# Altium PCB WSN_Enviroment Monitoring system.PcbDoc (part 1 of 2)
Units mil, origin at the board's own origin, x right, y up, seen from the top; angles counter-clockwise.
Board outline 1950 x 3410 mil, 2 copper layers (Top Layer, Bottom Layer); 31 components, 32 nets, 211 pads, 40 vias.
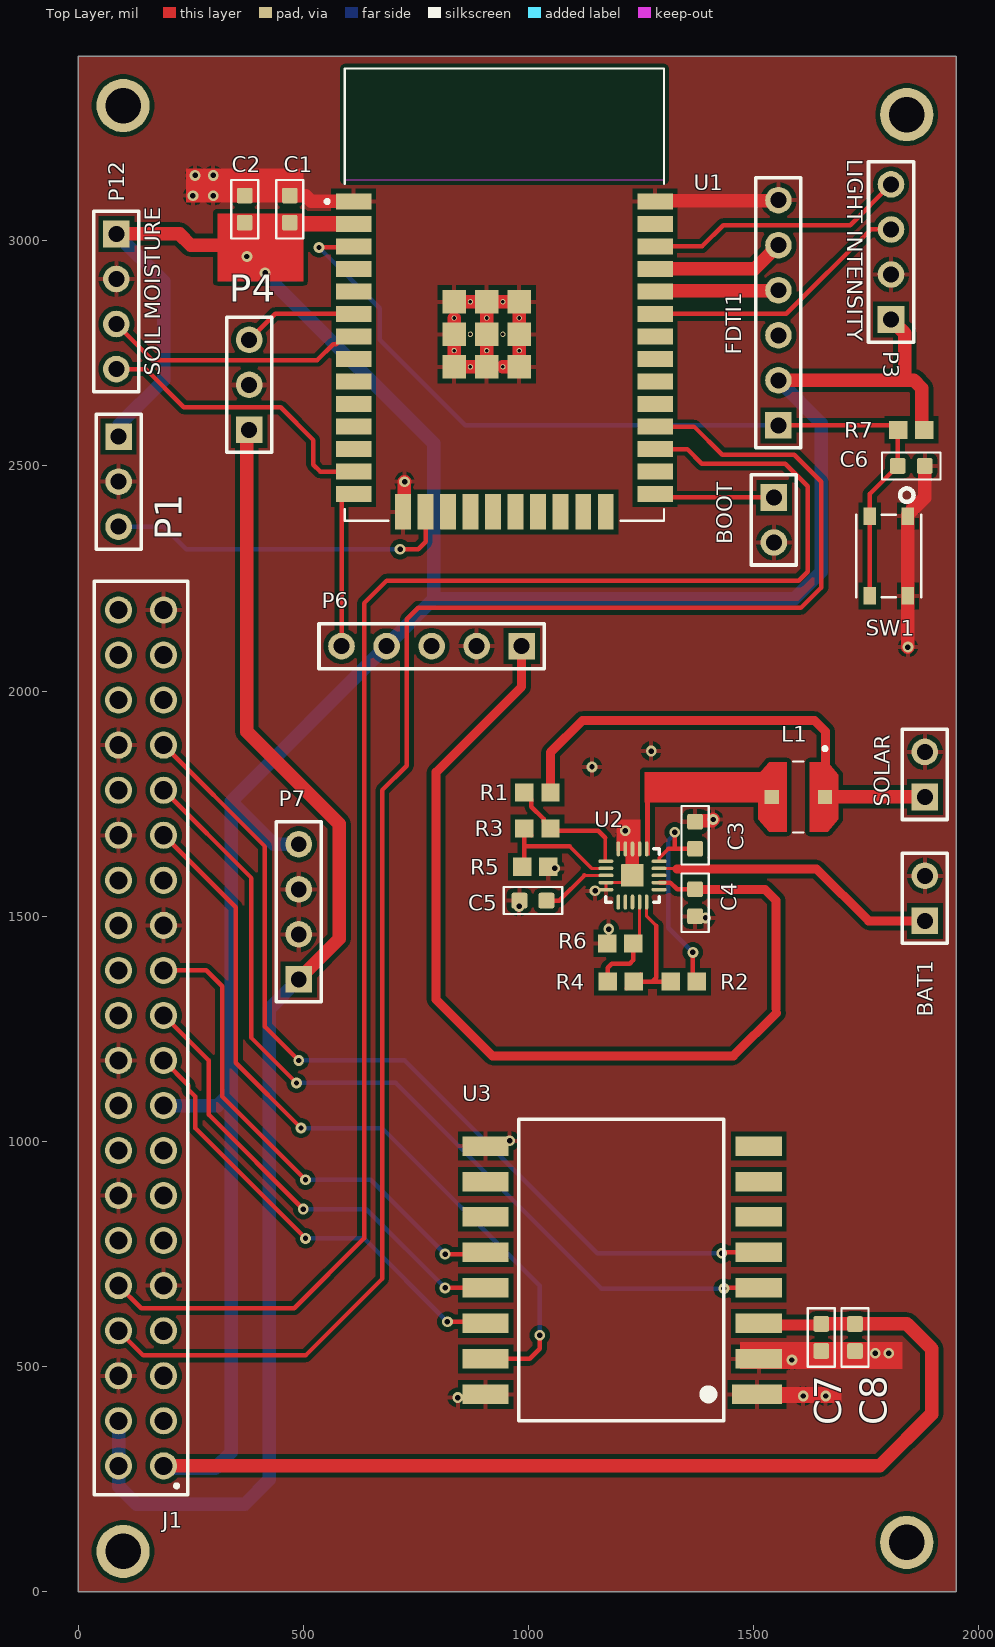
[diagram p0: Top Layer view]
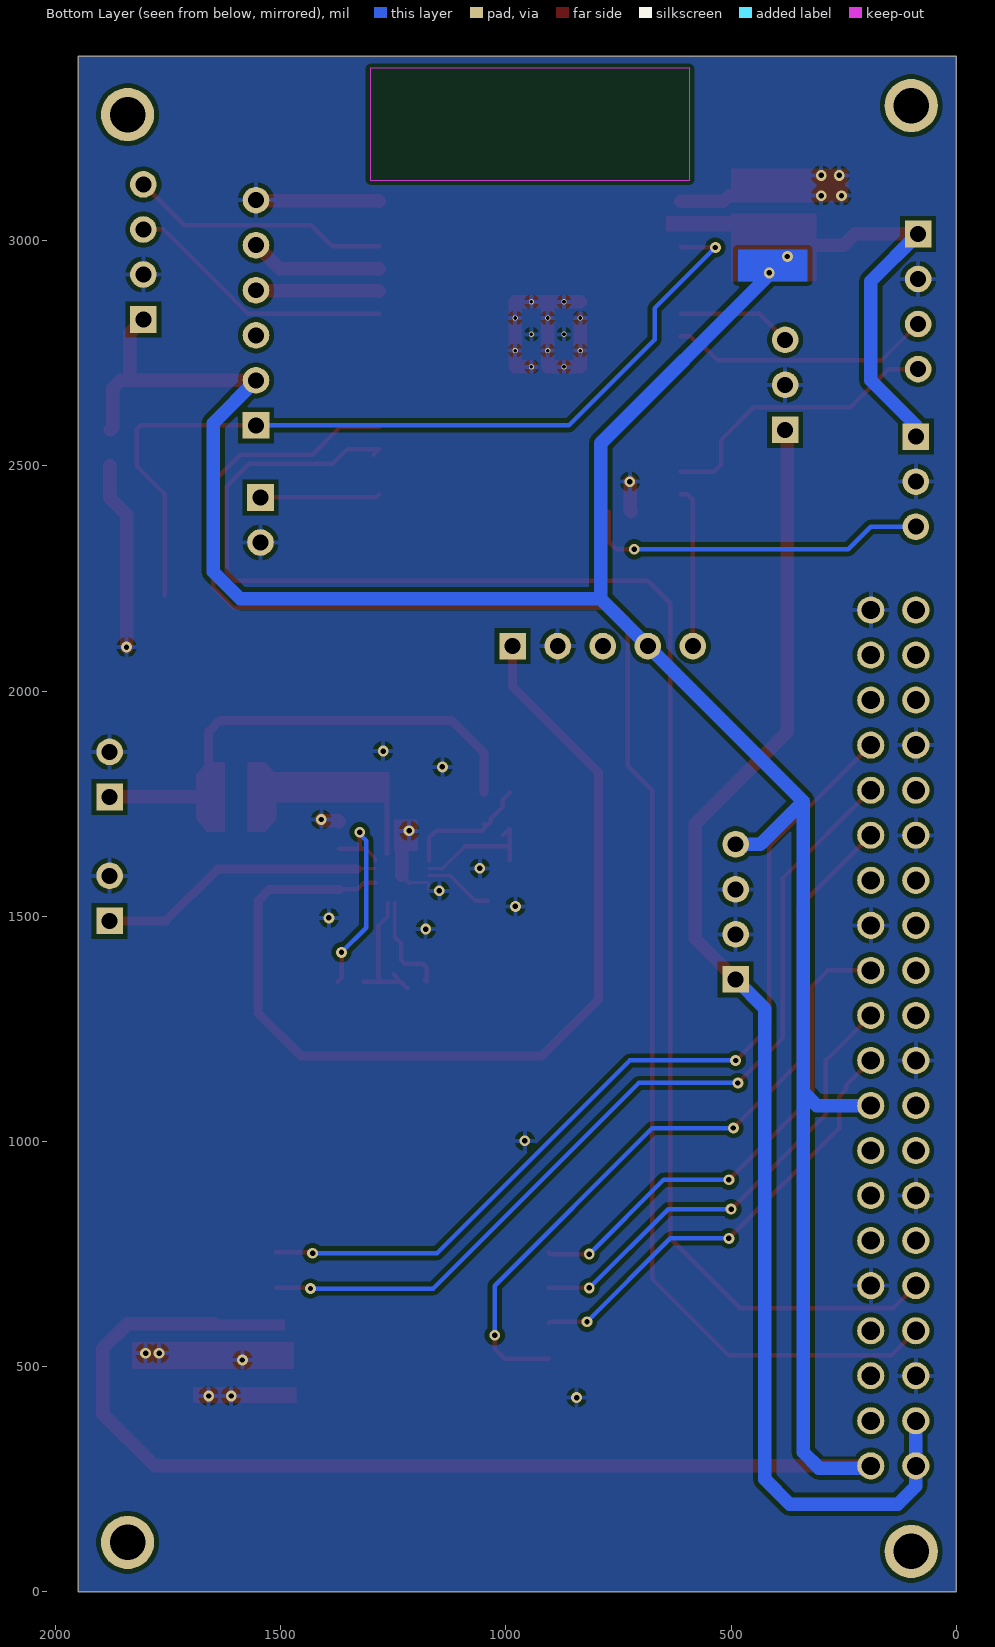
[diagram p1: Bottom Layer view, seen from below]
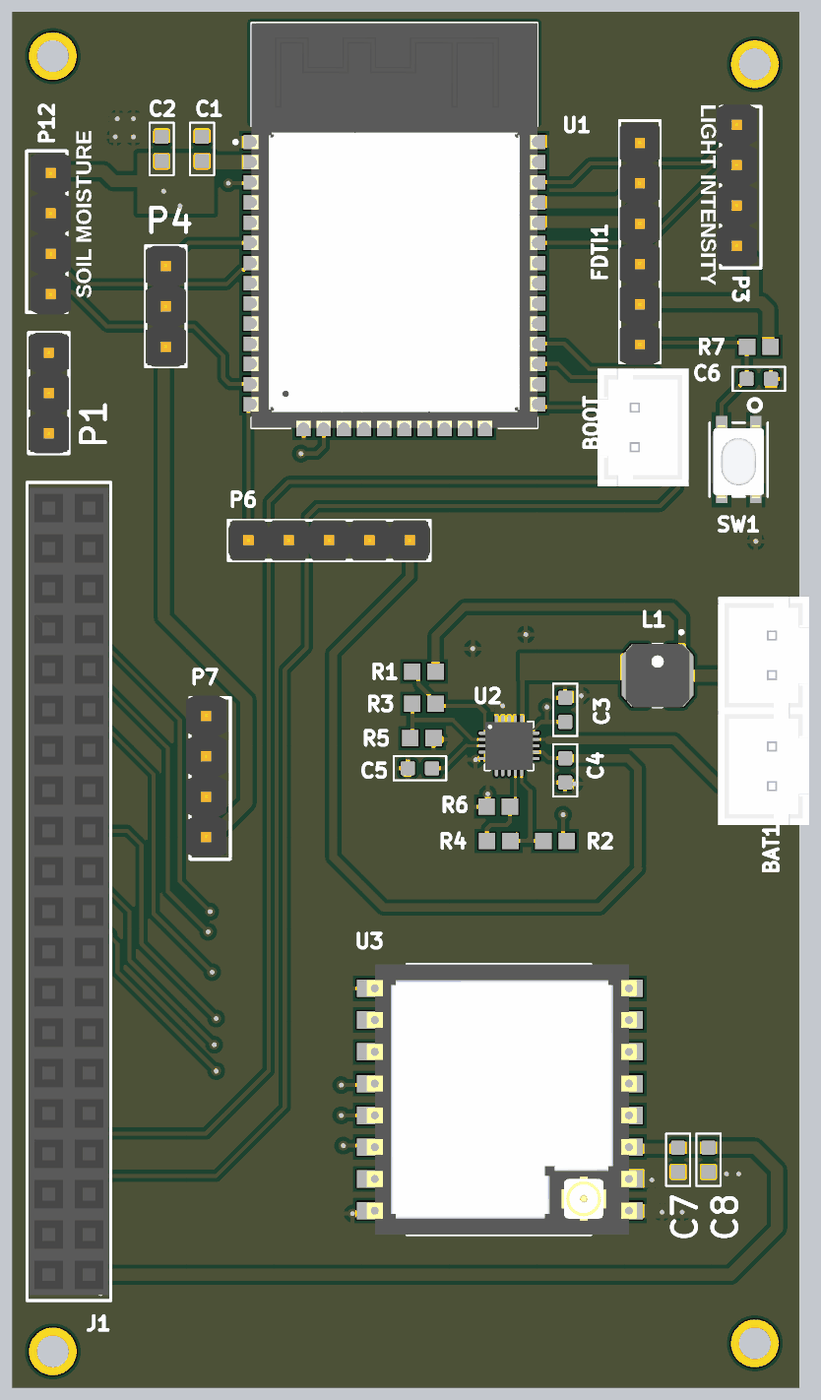
[diagram p2: 3D render of the assembled board from above, using the file's embedded part models]

## Layer stack, top to bottom
Top Solder: solder mask 0.4, Solder Resist, Dk 3.5
Top Layer: signal copper 1.4
Dielectric 1: dielectric 12.6, FR-4, Dk 4.8
Bottom Layer: signal copper 1.4
Bottom Solder: solder mask 0.4, Solder Resist, Dk 3.5

## Board outline
0,0 0,3410 1950,3410 1950,0

## Design rules (kind name [scope] priority, off if disabled: settings)
Clearance U2 [HasFootprint('QFN40P300X300X100-21N')] p1: gap=6 ignorepadtopadclearanceinfootprint=FALSE
Clearance [All] p2: gap=10 ignorepadtopadclearanceinfootprint=FALSE except(0: Arc-Hole Track-Hole SMDPad-Hole THPad-Hole Via-Hole Fill-Hole Poly-Hole Region-Hole Text-Hole; 7: Arc-Arc Arc-Track Track-Track)
MinimumSolderMaskSliver [All] p1: minsoldermaskwidth=4
PolygonConnect [All] p1: connectstyle=Relief reliefconductorwidth=10 reliefentries=4 polygonreliefangle="90 Angle" airgapwidth=10
RoutingVias [All] p1: holewidth=28 width=50 viastyle="Through Hole" minholewidth=28 minwidth=50 maxholewidth=28 maxwidth=50
SilkToSolderMaskClearance [IsPad] p1: minsilkscreentomaskgap=4 clearancetoexposedcopper=TRUE
SolderMaskExpansion [All] p1: expansion=4 istentingtop=FALSE
Width [All] p1: maxlimit=100 minlimit=7 preferedwidth=20
28 further rules are at their usual default settings.

## Classes and differential pairs
component class "TOP LEVEL": BAT1
component class MID12: P7
component class MID11: C3 C4 C5 L1 R1 R2 R3 R4 R5 R6 SOLAR U2
component class MID7: P6
component class MID2: BOOT C1 C2 C6 FDTI1 P1 P3 P4 P12 R7 SW1 U1
component class MID1: C7 C8 J1 U3

## Components (designator, comment, footprint, x,y, rotation, side; value= is the part's Value field where it differs from the comment)
BAT1 "Header 2" HDR1X2 1880,1490 r90 top
BOOT "Header 2" HDR1X2 1545,2430 r270 top
C1 "0.1uF" C0603 470,3070 r180 top
C2 "10uF" C0603 370,3070 r0 top
C3 "100uF" C0603 1370,1680 r180 top
C4 "0.1uF" C0603 1370,1530 r0 top
C5 "0.1uF" C0603 1010,1535 r270 top
C6 "0.1uF" C0603 1850,2500 r90 top
C7 "0.1uF" C0603 1650,565 r0 top
C8 "10uF" C0603 1725,565 r180 top
FDTI1 "Header 6" HDR1X6 1555,2590 r90 top
J1 "PRT-14017" 61304021821 140,1230 r90 top
L1 "22uH" IND_VLCF4020T-220MR56 1599.06,1765 r270 top
P1 "TEMP & HUMIDITY" HDR1X3 90,2565 r270 top
P3 "LIGHT INTENSITY" HDR1X4 1805,2825 r90 top
P4 "AIR QUALITY" HDR1X3 380,2580 r90 top
P6 "Header 5" HDR1X5 985,2100 r180 top
P7 "Header 4" HDR1X4 490,1360 r90 top
P12 "SOIL MOISTURE" HDR1X4 85,3015 r270 top
R1 "0R" RESC1607X60N 1020,1775 r0 top
R2 "6.2M" RESC1607X60N 1345,1355 r0 top
R3 "3M" RESC1607X60N 1020,1695 r0 top
R4 "1M" RESC1607X60N 1205,1355 r0 top
R5 "9.1M" RESC1607X60N 1015,1610 r180 top
R6 "3M" RESC1607X60N 1203.94,1440 r0 top
R7 "RC0603FR-0710KL" RESC1607X60N 1850,2580 r0 top
SOLAR "Header 2" HDR1X2 1880,1765 r90 top
SW1 "PTS815 SJM 250 SMTR LFS" "SW4_PTS815 SJM 250 SMTR LFS_CNK" 1800,2300 r270 top
U1 "ESP32-WROOM-32D" MODULE_ESP32-WROOM-32D 946.61,2880.43 r0 top
U2 "SPV1050TTR" QFN40P300X300X100-21N 1230.94,1590.75 r0 top
U3 "RA-02" RA-02 1208.15,714.37 r180 top

## Footprints (in the part's own frame and the unit in brackets; to place one, negate y for a bottom-side part, rotate by r counter-clockwise, add the part's x,y. Pads: shape width x height; smd on the part's side, far side on the other; paste and mask are expansions set on the pad)
61304021821 [mm]
  round 1.53 hole 1.02: 1(-24.13,-1.27) 2(-24.13,1.27) 3(-21.59,-1.27) 4(-21.59,1.27) 5(-19.05,-1.27) 6(-19.05,1.27) 7(-16.51,-1.27) 8(-16.51,1.27) 9(-13.97,-1.27) 10(-13.97,1.27) 11(-11.43,-1.27) 12(-11.43,1.27) 13(-8.89,-1.27) 14(-8.89,1.27) 15(-6.35,-1.27) 16(-6.35,1.27) 17(-3.81,-1.27) 18(-3.81,1.27) 19(-1.27,-1.27) 20(-1.27,1.27) 21(1.27,-1.27) 22(1.27,1.27) 23(3.81,-1.27) 24(3.81,1.27) 25(6.35,-1.27) 26(6.35,1.27) 27(8.89,-1.27) 28(8.89,1.27) 29(11.43,-1.27) 30(11.43,1.27) 31(13.97,-1.27) 32(13.97,1.27) 33(16.51,-1.27) 34(16.51,1.27) 35(19.05,-1.27) 36(19.05,1.27) 37(21.59,-1.27) 38(21.59,1.27) 39(24.13,-1.27) 40(24.13,1.27)
  silkscreen extent -25.75,-2.64 25.75,2.64, body extent -25.4,-2.5 25.4,2.5, height 13.75
C0603 [mil]
  rrect25% 35x35 smd: 1(0,30) 2(0,-30)
  silkscreen extent -30,-65 30,65
HDR1X2 [mm] "Connector; Header; 2 Position"
  rect 1.5x1.5 hole 0.9: 1(0,0)
  round 1.5 hole 0.9: 2(2.54,0)
  silkscreen extent -1.27,-1.27 3.81,1.27, body extent -2.43,-2.41 4.97,3.34, height 7.25
HDR1X3 [mm] "Connector; Header; 3 Position"
  rect 1.5x1.5 hole 0.9: 1(0,0)
  round 1.5 hole 0.9: 2(2.54,0) 3(5.08,0)
  silkscreen extent -1.27,-1.27 6.35,1.27, body extent -1.27,-1.27 6.35,1.27, height 8.67
HDR1X4 [mm] "Connector; Header; 4 Position"
  rect 1.5x1.5 hole 0.9: 1(0,0)
  round 1.5 hole 0.9: 2(2.54,0) 3(5.08,0) 4(7.62,0)
  silkscreen extent -1.27,-1.27 8.89,1.27, body extent -1.14,-1.02 9.02,1.52, height 8.67
HDR1X5 [mm] "Connector; Header; 5 Position"
  rect 1.5x1.5 hole 0.9: 1(0,0)
  round 1.5 hole 0.9: 2(2.54,0) 3(5.08,0) 4(7.62,0) 5(10.16,0)
  silkscreen extent -1.27,-1.27 11.43,1.27, body extent -1.27,-1.27 11.43,1.27, height 8.67
HDR1X6 [mm] "Connector; Header; 6 Position"
  rect 1.5x1.5 hole 0.9: 1(0,0)
  round 1.5 hole 0.9: 2(2.54,0) 3(5.08,0) 4(7.62,0) 5(10.16,0) 6(12.7,0)
  silkscreen extent -1.27,-1.27 13.97,1.27, body extent -1.4,-1.27 13.84,1.27, height 8.67
IND_VLCF4020T-220MR56 [mm]
  rect 0.8x0.8 smd paste-1 mask+0: 1(0,1.5) 2(0,-1.5)
  Top Layer region: 1.95,1.65 1.95,0.65 -1.95,0.65 -1.95,1.65 -1.25,2.25 1.25,2.25
  Top Layer region: 1.95,-1.65 1.25,-2.25 -1.25,-2.25 -1.95,-1.65 -1.95,-0.65 1.95,-0.65
  silkscreen extent -2.82,-0.3 2,1.6, body extent -2,-2 2,2, height 2
MODULE_ESP32-WROOM-32D [mm]
  rect 2x0.9 smd: 1(-8.5,5.26) 2(-8.5,3.99) 3(-8.5,2.72) 4(-8.5,1.45) 5(-8.5,0.18) 6(-8.5,-1.09) 7(-8.5,-2.36) 8(-8.5,-3.63) 9(-8.5,-4.9) 10(-8.5,-6.17) 11(-8.5,-7.44) 12(-8.5,-8.71) 13(-8.5,-9.98) 14(-8.5,-11.25) 25(8.5,-11.25) 26(8.5,-9.98) 27(8.5,-8.71) 28(8.5,-7.44) 29(8.5,-6.17) 30(8.5,-4.9) 31(8.5,-3.63) 32(8.5,-2.36) 33(8.5,-1.09) 34(8.5,0.18) 35(8.5,1.45) 36(8.5,2.72) 37(8.5,3.99) 38(8.5,5.26)
  rect 0.9x2 smd: 15(-5.715,-12.25) 16(-4.445,-12.25) 17(-3.175,-12.25) 18(-1.905,-12.25) 19(-0.635,-12.25) 20(0.635,-12.25) 21(1.905,-12.25) 22(3.175,-12.25) 23(4.445,-12.25) 24(5.715,-12.25)
  rect 1.33x1.33 smd: 39_1(-2.835,-0.405) 39_2(-1,-0.405) 39_3(0.835,-0.405) 39_4(-2.835,-2.24) 39_5(-1,-2.24) 39_6(0.835,-2.24) 39_7(-2.835,-4.075) 39_8(-1,-4.075) 39_9(0.835,-4.075)
  round 0.3 hole 0.2: 39_10(-1.917,-0.405) 39_11(-0.082,-0.405) 39_12(-2.835,-1.322) 39_13(-1,-1.322) 39_14(0.835,-1.322) 39_15(-1.917,-2.24) 39_16(-0.082,-2.24) 39_17(-2.835,-3.157) 39_18(-1,-3.157) 39_19(0.835,-3.157) 39_20(-1.917,-4.075) 39_21(-0.082,-4.075)
  Keep-Out Layer region: 9,6.45 -9,6.45 -9,12.75 9,12.75
  silkscreen extent -10.1,-12.75 9,12.75, body extent -9,-12.75 9,12.75, height 3.25
QFN40P300X300X100-21N [mm]
  oval 0.85x0.2 smd: 1(-1.5,0.8) 2(-1.5,0.4) 3(-1.5,0) 4(-1.5,-0.4) 5(-1.5,-0.8) 11(1.5,-0.8) 12(1.5,-0.4) 13(1.5,0) 14(1.5,0.4) 15(1.5,0.8)
  oval 0.2x0.85 smd: 6(-0.8,-1.5) 7(-0.4,-1.5) 8(0,-1.5) 9(0.4,-1.5) 10(0.8,-1.5) 16(0.8,1.5) 17(0.4,1.5) 18(0,1.5) 19(-0.4,1.5) 20(-0.8,1.5)
  rrect4% 1.27x1.27 smd paste-2: 21(0,0)
  silkscreen extent -1.5,-1.5 1.5,1.5, body extent -1.5,-1.5 1.5,1.5, height 1
RA-02 [mm]
  rect 2.8x1.1 smd: 1(-7.6,7)
  rect 2.6x1.1 smd: 2(-7.7,5) 3(-7.7,3) 4(-7.7,1) 5(-7.7,-1) 6(-7.7,-3) 7(-7.7,-5) 8(-7.7,-7) 9(7.7,-7) 10(7.7,-5) 11(7.7,-3) 12(7.7,-1) 13(7.7,1) 14(7.7,3) 15(7.7,5) 16(7.7,7)
  silkscreen extent -5.72,-8.5 5.84,8.5, body extent -8.63,-8.5 8.37,8.5, height 3.3
RESC1607X60N [mm]
  rect 1.04x1.02 smd: 1(-0.735,0) 2(0.735,0)
"SW4_PTS815 SJM 250 SMTR LFS_CNK" [mil]
  rect 39x28 smd paste+0 mask+0: 1(-88.58,42.32) 2(88.58,42.32) 3(-88.58,-42.32) 4(88.58,-42.32)
  silkscreen extent -150,-72 92,72, body extent -86,-63 96,63, height 106

## Part data
BAT1: "CONN HEADER EH TOP 2POS 2.5MM", Color=Natural, Housing Color=White, Manufacturer=JST, Manufacturer Part Number=B2B-EH-A, Package Quantity=1000, Supplier Part Number 1=455-B2B-EH-A-ND, Category=Connectors, ComponentLink1Description=https://media.digikey.com/pdf/Data%20Sheets/JST%20PDFs/EH%20Series.pdf?src-supplier=Digikey, ComponentLink1URL=https://media.digikey.com/pdf/Data%20Sheets/JST%20PDFs/EH%20Series.pdf?src-supplier=Digikey, Contact Material=Brass, Contact Mating Length=0.13inch, Contact Plating=Tin,Lead, Contact Type="Male Pin", Fastening Type=Detent, Gender=Male, Housing Material=Nylon, LatestRevisionDate=17-Jul-2002, LatestRevisionNote="Re-released for DXP Platform.", Lead Free="Contains Lead", Mount="Through Hole", Number of Contacts=2, Number of Positions=2, Number of Rows=1, Packaging=Bulk, Pitch=0.098inch, Pricing 1="1=0.13, 10=0.099, 100=0.0756, 500=0.06274, 1000=0.05803, 5000=0.04865, 10000=0.04521 (USD)", Publisher="Altium Limited", RoHS=Yes, Series=EH, Stock 1=251874, Supplier 1=Digikey, Termination=Press-Fit
BOOT: "THT Vertical Pin Header WR-PHD, Pitch 2.54 mm, Single Row, 2 pins", Color=Black, Contact Resistance=20mR, Current Rating=3A, Manufacturer="Wurth Electronics", Manufacturer Part Number=61300211121, Max Operating Temperature=125°C, Min Operating Temperature=-40°C, Operating Supply Voltage=250V, Supplier Part Number 1=732-5315-ND, Category="Headers and Wire Housings", ComponentLink1Description=https://datasheet.ciiva.com/13619/6130xx11121-48870-13619345.pdf?src-supplier=Mouser, ComponentLink1URL=https://datasheet.ciiva.com/13619/6130xx11121-48870-13619345.pdf?src-supplier=Mouser, Contact Gender=Male, Contact Material="Copper Alloy,Copper", Contact Mating Length=0.236inch, Contact Plating=Gold, Contact Type="Male Pin", Gender=29Gender, Height=8.94mm, Housing Material=PBT, LatestRevisionDate=17-Jul-2002, LatestRevisionNote="Re-released for DXP Platform.", Lead Free=5697LeadFree, Mount="Through Hole", Number of Contacts=2, Number of Positions=2, Number of Rows=1, Orientation=5495OrientationType, Packaging=Bulk, Pitch=0.1inch, Pricing 1="1=0.13, 10=0.113, 25=0.094, 50=0.079, 100=0.071, 1000=0.065 (USD)", Publisher="Altium Limited", Reach SVHC Compliant=Unknown, RoHS=Yes, RoHS Compliant=Yes, Series=WR-PHD, Stock 1=83516, Supplier 1=Digikey, Termination="Through Hole", Voltage Rating=250V
C1 C6: library part C0603C104J4RACTU, "Capacitor; Ceramic; Cap; .100uF; Tol+5%; SMT; Vol-Rtg 16V; X7R; TR", Capacitance=100nF, Case Code (Imperial)=0603, Case Code (Metric)=1608, Dielectric=X7R, Dielectric Material=4241ConductorMaterial, Manufacturer=KEMET, Max Operating Temperature=125°C, Min Operating Temperature=-55°C, Package="0603 Kemet", Package Quantity=4000, Supplier Part Number 1=399-C0603C104J4RACTUCT-ND, Temperature Coefficient=30ppm/°C, Tolerance=5%, Voltage=16V, Availability=Unavailable, Case/Package=0603, Category="Ceramic Capacitors", ComponentLink1Description=https://datasheet.ciiva.com/5999/1732731-5999390.pdf?src-supplier=Farnell, ComponentLink1URL=https://datasheet.ciiva.com/5999/1732731-5999390.pdf?src-supplier=Farnell, ComponentLink2Description=https://datasheet.ciiva.com/28645/1851736-28645613.pdf?src-supplier=Element14, ComponentLink2URL=https://datasheet.ciiva.com/28645/1851736-28645613.pdf?src-supplier=Element14, ComponentLink3Description=https://datasheet.ciiva.com/7823/kem-c1002-x7r-smd-7823982.pdf?src-supplier=Element14, ComponentLink3URL=https://datasheet.ciiva.com/7823/kem-c1002-x7r-smd-7823982.pdf?src-supplier=Element14, Construction=Flat, Depth=0.8mm, Dissipation Factor=3.5%, Height=0.8mm, Lead Free=5697LeadFree, Lead Pitch=0.7mm, Length=1.6mm, Manufacturer Part Number=C0603C104J4RACTU, Material=4241ConductorMaterial, MF=KEMET, Mount="Surface Mount", MP=C0603C104J4RACTU, Number of Pins=2, Packaging="Tape and Reel", Price=None, Pricing 1="1=0.12, 10=0.065, 50=0.0452, 100=0.0391, 500=0.02854, 1000=0.02527 (USD)", Radiation Hardening=No, Reach SVHC Compliant=No, RoHS=Yes, RoHS Compliant=Yes, Series="SMD Comm X7R", SnapEDA_Link=https://www.snapeda.com/parts/C0603C104J4RACTU/KEMET/view-part/550758/?ref=snap, Stock 1=206335, Supplier 1=Digikey, Termination=SMD/SMT, Voltage Rating=16V, Voltage Rating (DC)=16V, Width=0.8mm
C2: library part CERAMIC-10UF-10V-10%-X5R(0603), "Multilayer Ceramic Capacitors MLCC - SMD/SMT 16V 10uF X5R 0603 10%", Case/Package=345Case, Dielectric=1537DielectricType, Manufacturer="Kyocera AVX", Manufacturer Part Number=0603YD106KAT2A, Max Operating Temperature=85°C, Min Operating Temperature=-55°C, Package=None, Supplier Part Number 1=478-KGM15CR51C106KTCT-ND, Tolerance=10%, Voltage Rating=16V, Availability=Unavailable, Capacitance=10uF, Category="Ceramic Capacitors", Height=940um, Material=4241ConductorMaterial, MP=CERAMIC-10UF-10V-10%-X5R(0603), Price=None, Pricing 1="1=0.37, 10=0.216, 50=0.1554, 100=0.1367, 500=0.10482, 1000=0.09488 (USD)", RoHS=Yes, Stock 1=6982, Supplier 1=Digikey, Voltage Rating (DC)=16V
C3: library part C0603C104J4RACTU, "Cap Tant Solid 100uF 4V M CASE 20% 1810-09 T/R", Case Code (Imperial)=0603, Case Code (Metric)=1608, Manufacturer="Vishay Sprague", Manufacturer Part Number=298W107X0004M2T, Max Operating Temperature=125°C, Min Operating Temperature=-55°C, Supplier Part Number 1=718-2216-1-ND, Tolerance=20%, Voltage Rating=4V, Availability=Unavailable, Capacitance=100uF, Case/Package=0603, Category="Tantalum Capacitors", ComponentLink1Description=http://www.vishay.com/docs/40169/typperfchar298dwtrl8.pdf?src-supplier=Digikey, ComponentLink1URL=http://www.vishay.com/docs/40169/typperfchar298dwtrl8.pdf?src-supplier=Digikey, ComponentLink2Description=http://www.vishay.com/docs/40065/298d298w.pdf?src-supplier=Digikey, ComponentLink2URL=http://www.vishay.com/docs/40065/298d298w.pdf?src-supplier=Digikey, Features="General Purpose", MF="Vishay Sprague", Mount="Surface Mount", MP=298W107X0004M2T, Package=0603, Packaging="Cut Tape", Price=None, Pricing 1="1=1.93, 10=1.23, 50=0.9484, 100=0.8606, 500=0.71056, 1000=0.66366 (USD)", RoHS=Yes, RoHS Compliant=Yes, Series="MICROTAN®, 298W", Stock 1=3940, Supplier 1=Digikey
C4 C5: library part C0603C104J4RACTU, "Capacitor; Ceramic; Cap; .100uF; Tol+5%; SMT; Vol-Rtg 16V; X7R; TR", Capacitance=100nF, Case Code (Imperial)=0603, Case Code (Metric)=1608, Dielectric=X7R, Dielectric Material=4241ConductorMaterial, Manufacturer=KEMET, Max Operating Temperature=125°C, Min Operating Temperature=-55°C, Package="0603 Kemet", Package Quantity=4000, Supplier Part Number 1=80-C0603C104J4R, Temperature Coefficient=30ppm/°C, Tolerance=5%, Voltage=16V, Availability=Unavailable, Case/Package=0603, Category="Ceramic Capacitors", ComponentLink1Description=https://datasheet.ciiva.com/5999/1732731-5999390.pdf?src-supplier=Farnell, ComponentLink1URL=https://datasheet.ciiva.com/5999/1732731-5999390.pdf?src-supplier=Farnell, ComponentLink2Description=https://datasheet.ciiva.com/28645/1851736-28645613.pdf?src-supplier=Element14, ComponentLink2URL=https://datasheet.ciiva.com/28645/1851736-28645613.pdf?src-supplier=Element14, ComponentLink3Description=https://datasheet.ciiva.com/7823/kem-c1002-x7r-smd-7823982.pdf?src-supplier=Element14, ComponentLink3URL=https://datasheet.ciiva.com/7823/kem-c1002-x7r-smd-7823982.pdf?src-supplier=Element14, Construction=Flat, Depth=0.8mm, Dissipation Factor=3.5%, Height=0.8mm, Lead Free=5697LeadFree, Lead Pitch=0.7mm, Length=1.6mm, Manufacturer Part Number=C0603C104J4RACTU, Material=4241ConductorMaterial, MF=KEMET, Mount="Surface Mount", MP=C0603C104J4RACTU, Number of Pins=2, Packaging="Tape and Reel", Price=None, Pricing 1="1=0.12, 10=0.035, 50=0.035, 100=0.018, 1000=0.013, 10000=0.006 (USD)", Radiation Hardening=No, Reach SVHC Compliant=No, RoHS=Yes, RoHS Compliant=Yes, Series="SMD Comm X7R", SnapEDA_Link=https://www.snapeda.com/parts/C0603C104J4RACTU/KEMET/view-part/550758/?ref=snap, Stock 1=240765, Supplier 1=Mouser, Termination=SMD/SMT, Voltage Rating=16V, Voltage Rating (DC)=16V, Width=0.8mm
C7: library part C0603C104J4RACTU, "0.1ÂµF Â±5% 16V Ceramic Capacitor X7R 0603 _1608 Metric_", Package="0603 Kemet", Availability=Unavailable, MF=KEMET, MP=C0603C104J4RACTU, Price=None, SnapEDA_Link=https://www.snapeda.com/parts/C0603C104J4RACTU/KEMET/view-part/550758/?ref=snap
C8: library part CERAMIC-10UF-10V-10%-X5R(0603), "302010103", Package=None, Availability=Unavailable, MP=CERAMIC-10UF-10V-10%-X5R(0603), Price=None
FDTI1: "THT Vertical Pin Header WR-PHD, Pitch 2.54 mm, Single Row, 6 pins", Color=Black, Contact Resistance=20mR, Current Rating=3A, Manufacturer="Wurth Electronics", Manufacturer Part Number=61300611121, Max Operating Temperature=125°C, Min Operating Temperature=-40°C, Operating Supply Voltage=250V, Supplier Part Number 1=732-5319-ND, Category="Headers and Wire Housings", ComponentLink1Description=http://www.mouser.com/ds/2/445/6130xx11121-538006.pdf?src-supplier=Mouser, ComponentLink1URL=http://www.mouser.com/ds/2/445/6130xx11121-538006.pdf?src-supplier=Mouser, ComponentLink2Description=http://www.farnell.com/cad/1737268.pdf?src-supplier=Element14, ComponentLink2URL=http://www.farnell.com/cad/1737268.pdf?src-supplier=Element14, ComponentLink3Description=https://datasheet.octopart.com/61300611121-W%C3%BCrth-Elektronik-datasheet-21154836.pdf?src-supplier=Element14, ComponentLink3URL=https://datasheet.octopart.com/61300611121-W%C3%BCrth-Elektronik-datasheet-21154836.pdf?src-supplier=Element14, ComponentLink4Description=https://katalog.we-online.de/em/datasheet/6130xx11121.pdf?src-supplier=Digikey, ComponentLink4URL=https://katalog.we-online.de/em/datasheet/6130xx11121.pdf?src-supplier=Digikey, Contact Gender=Male, Contact Material="Copper Alloy,Copper", Contact Mating Length=0.236inch, Contact Plating=Gold, Contact Type="Male Pin", Gender=29Gender, Height=8.89mm, Housing Material=PBT, LatestRevisionDate=17-Jul-2002, LatestRevisionNote="Re-released for DXP Platform.", Lead Free=5697LeadFree, Mount="Through Hole", Number of Contacts=6, Number of Positions=6, Number of Rows=1, Orientation=5495OrientationType, Packaging=Bulk, Pitch=0.1inch, Pricing 1="1=0.34, 10=0.298, 25=0.2472, 50=0.207, 100=0.187, 1000=0.171 (USD)", Publisher="Altium Limited", Reach SVHC Compliant=Unknown, RoHS=Yes, RoHS Compliant=Yes, Series=WR-PHD, Stock 1=21894, Supplier 1=Digikey, Termination="Through Hole", Voltage Rating=250V
J1: "Conn Stackable Header F 40 POS 2.54mm Solder ST Thru-Hole", Manufacturer=SparkFun, Package=None, Supplier Part Number 1=1568-1462-ND, Availability="In Stock", Category=LDO, Check_prices=https://www.snapeda.com/parts/PRT-14017/SparkFun+Electronics/view-part/?ref=eda, ComponentLink1Description=https://media.digikey.com/pdf/Data%20Sheets/Sparkfun%20PDFs/PRT-14017_Web.pdf?src-supplier=Digikey, ComponentLink1URL=https://media.digikey.com/pdf/Data%20Sheets/Sparkfun%20PDFs/PRT-14017_Web.pdf?src-supplier=Digikey, ComponentLink2Description=https://media.digikey.com/pdf/Data%20Sheets/Sparkfun%20PDFs/PRT-14017_Web.pdf?src-supplier=Mouser, ComponentLink2URL=https://media.digikey.com/pdf/Data%20Sheets/Sparkfun%20PDFs/PRT-14017_Web.pdf?src-supplier=Mouser, Manufacturer Part Number=PRT-14017, MF="SparkFun Electronics", MP=PRT-14017, Price=None, Pricing 1="1=2.75 (USD)", Purchase-URL=https://pricing.snapeda.com/search/part/PRT-14017/?ref=eda, RoHS=No, SnapEDA_Link=https://www.snapeda.com/parts/PRT-14017/SparkFun+Electronics/view-part/?ref=snap, Stock 1=521, Supplier 1=Digikey
L1: library part VLCF4020T-220MR56, "Inductor Power Shielded Wirewound 22uH 20% 100KHz Ferrite 830mA 431mOhm DCR 1515 Blister T/R", Manufacturer=TDK, Package="NON STANDARD-2 TDK", Supplier Part Number 1=445-3188-1-ND, Category="Fixed Inductors", Check_prices=https://www.snapeda.com/parts/VLCF4020T-220MR56/TDK/view-part/?ref=eda, ComponentLink1Description=https://datasheet.ciiva.com/15160/getdatasheetpartid-122360-15160436.pdf?src-supplier=Verical, ComponentLink1URL=https://datasheet.ciiva.com/15160/getdatasheetpartid-122360-15160436.pdf?src-supplier=Verical, ComponentLink2Description=https://datasheet.ciiva.com/11802/0900766b807a173d-11802556.pdf?src-supplier=Rs, ComponentLink2URL=https://datasheet.ciiva.com/11802/0900766b807a173d-11802556.pdf?src-supplier=Rs, ComponentLink3Description=https://datasheet.ciiva.com/8045/321084-8045781.pdf?src-supplier=Element14, ComponentLink3URL=https://datasheet.ciiva.com/8045/321084-8045781.pdf?src-supplier=Element14, ComponentLink4Description=https://datasheet.ciiva.com/30100/print-detail-pdf-phplangenpart-novlcf4020t-220mr56nreimp-unit-xmh-30100198.pdf?src-supplier=Onlinecomponents.com, ComponentLink4URL=https://datasheet.ciiva.com/30100/print-detail-pdf-phplangenpart-novlcf4020t-220mr56nreimp-unit-xmh-30100198.pdf?src-supplier=Onlinecomponents.com, ComponentLink5Description=https://datasheet.ciiva.com/15993/e531-vlcf4020-15993468.pdf?src-supplier=Onlinecomponents.com, ComponentLink5URL=https://datasheet.ciiva.com/15993/e531-vlcf4020-15993468.pdf?src-supplier=Onlinecomponents.com, Manufacturer Part Number=VLCF4020T-220MR56, MF=TDK, MP=VLCF4020T-220MR56, Pricing 1="1=0.55, 10=0.372, 25=0.3292, 50=0.2862 (USD)", RoHS=Yes, SnapEDA_Link=https://www.snapeda.com/parts/VLCF4020T-220MR56/TDK/view-part/?ref=snap, Stock 1=9835, Supplier 1=Digikey
P1 P4: library part "Header 3", "THT Vertical Pin Header WR-PHD, Pitch 2.54 mm, Single Row, 3 pins", Color=Black, Contact Resistance=20mR, Current Rating=3A, Manufacturer="Wurth Electronics", Manufacturer Part Number=61300311121, Max Operating Temperature=105°C, Min Operating Temperature=-40°C, Operating Supply Voltage=250V, Supplier Part Number 1=732-5316-ND, Category="Headers and Wire Housings", ComponentLink1Description=http://www.farnell.com/cad/1737268.pdf?src-supplier=Element14, ComponentLink1URL=http://www.farnell.com/cad/1737268.pdf?src-supplier=Element14, ComponentLink2Description=https://datasheet.octopart.com/61300311121-W%C3%BCrth-Elektronik-datasheet-21154836.pdf?src-supplier=Element14, ComponentLink2URL=https://datasheet.octopart.com/61300311121-W%C3%BCrth-Elektronik-datasheet-21154836.pdf?src-supplier=Element14, ComponentLink3Description=https://katalog.we-online.de/em/datasheet/6130xx11121.pdf?src-supplier=Digikey, ComponentLink3URL=https://katalog.we-online.de/em/datasheet/6130xx11121.pdf?src-supplier=Digikey, Contact Material=Copper, Contact Mating Length=0.236inch, Contact Plating=Gold, Contact Type="Male Pin", Gender=Male, Height=8.94mm, LatestRevisionDate=17-Jul-2002, LatestRevisionNote="Re-released for DXP Platform.", Lead Free="Lead Free", Mount="Through Hole", Number of Contacts=3, Number of Positions=3, Number of Rows=1, Orientation=5495OrientationType, Packaging=Bulk, Pitch=0.1inch, Pricing 1="1=0.13, 10=0.113, 25=0.094, 50=0.079, 100=0.071, 1000=0.066 (USD)", Publisher="Altium Limited", Reach SVHC Compliant=Unknown, RoHS=Yes, RoHS Compliant=Yes, Series=WR-PHD, Stock 1=158018, Supplier 1=Digikey, Termination=Solder, Voltage Rating=250V
P3 P12: library part "Header 4", "THT Vertical Pin Header WR-PHD, Pitch 2.54 mm, Single Row, 4 pins", Color=Black, Manufacturer="Wurth Electronics", Manufacturer Part Number=61300411121, Supplier Part Number 1=732-5317-ND, Category="Headers and Wire Housings", ComponentLink1Description=http://www.farnell.com/cad/1737268.pdf?src-supplier=Element14, ComponentLink1URL=http://www.farnell.com/cad/1737268.pdf?src-supplier=Element14, ComponentLink2Description=https://datasheet.octopart.com/61300411121-W%C3%BCrth-Elektronik-datasheet-21154836.pdf?src-supplier=Element14, ComponentLink2URL=https://datasheet.octopart.com/61300411121-W%C3%BCrth-Elektronik-datasheet-21154836.pdf?src-supplier=Element14, ComponentLink3Description=https://katalog.we-online.de/em/datasheet/6130xx11121.pdf?src-supplier=Digikey, ComponentLink3URL=https://katalog.we-online.de/em/datasheet/6130xx11121.pdf?src-supplier=Digikey, Contact Material=Copper, Contact Mating Length=0.236inch, Contact Plating=Gold, Contact Type="Male Pin", LatestRevisionDate=17-Jul-2002, LatestRevisionNote="Re-released for DXP Platform.", Mount="Through Hole", Number of Contacts=4, Number of Positions=4, Number of Rows=1, Packaging=Bulk, Pitch=0.1inch, Pricing 1="1=0.19, 10=0.163, 25=0.1352, 50=0.113, 100=0.102, 1000=0.094 (USD)", Publisher="Altium Limited", Reach SVHC Compliant=Unknown, RoHS=Yes, RoHS Compliant=Yes, Series=WR-PHD, Stock 1=43988, Supplier 1=Digikey, Termination=Solder
P6: "THT Vertical Pin Header WR-PHD, Pitch 2.54 mm, Single Row, 5 pins", Color=Black, Contact Resistance=20mR, Current Rating=3A, Manufacturer="Wurth Electronics", Manufacturer Part Number=61300511121, Max Operating Temperature=105°C, Min Operating Temperature=-40°C, Operating Supply Voltage=250V, Supplier Part Number 1=732-5318-ND, Category="Headers and Wire Housings", ComponentLink1Description=http://www.farnell.com/cad/1737268.pdf?src-supplier=Element14, ComponentLink1URL=http://www.farnell.com/cad/1737268.pdf?src-supplier=Element14, ComponentLink2Description=https://datasheet.octopart.com/61300511121-W%C3%BCrth-Elektronik-datasheet-21154836.pdf?src-supplier=Element14, ComponentLink2URL=https://datasheet.octopart.com/61300511121-W%C3%BCrth-Elektronik-datasheet-21154836.pdf?src-supplier=Element14, ComponentLink3Description=https://katalog.we-online.de/em/datasheet/6130xx11121.pdf?src-supplier=Digikey, ComponentLink3URL=https://katalog.we-online.de/em/datasheet/6130xx11121.pdf?src-supplier=Digikey, Contact Material=Copper, Contact Mating Length=0.236inch, Contact Plating=Gold, Contact Type="Male Pin", Gender=Male, Height=8.89mm, LatestRevisionDate=17-Jul-2002, LatestRevisionNote="Re-released for DXP Platform.", Lead Free="Lead Free", Mount="Through Hole", Number of Contacts=5, Number of Positions=5, Number of Rows=1, Orientation=5495OrientationType, Packaging=Bulk, Pitch=0.1inch, Pricing 1="1=0.26, 10=0.222, 25=0.1852, 50=0.155, 100=0.141, 1000=0.128 (USD)", Publisher="Altium Limited", Reach SVHC Compliant=Unknown, RoHS=Yes, RoHS Compliant=Yes, Series=WR-PHD, Stock 1=36429, Supplier 1=Digikey, Termination=Solder, Voltage Rating=250V
P7: "THT Vertical Pin Header WR-PHD, Pitch 2.54 mm, Single Row, 4 pins", Color=Black, Manufacturer="Wurth Electronics", Manufacturer Part Number=61300411121, Supplier Part Number 1=732-5317-ND, Category="Headers and Wire Housings", ComponentLink1Description=http://www.farnell.com/cad/1737268.pdf?src-supplier=Element14, ComponentLink1URL=http://www.farnell.com/cad/1737268.pdf?src-supplier=Element14, ComponentLink2Description=https://datasheet.octopart.com/61300411121-W%C3%BCrth-Elektronik-datasheet-21154836.pdf?src-supplier=Element14, ComponentLink2URL=https://datasheet.octopart.com/61300411121-W%C3%BCrth-Elektronik-datasheet-21154836.pdf?src-supplier=Element14, ComponentLink3Description=https://katalog.we-online.de/em/datasheet/6130xx11121.pdf?src-supplier=Digikey, ComponentLink3URL=https://katalog.we-online.de/em/datasheet/6130xx11121.pdf?src-supplier=Digikey, Contact Material=Copper, Contact Mating Length=0.236inch, Contact Plating=Gold, Contact Type="Male Pin", LatestRevisionDate=17-Jul-2002, LatestRevisionNote="Re-released for DXP Platform.", Mount="Through Hole", Number of Contacts=4, Number of Positions=4, Number of Rows=1, Packaging=Bulk, Pitch=0.1inch, Pricing 1="1=0.19, 10=0.163, 25=0.1352, 50=0.113, 100=0.102, 1000=0.094 (USD)", Publisher="Altium Limited", Reach SVHC Compliant=Unknown, RoHS=Yes, RoHS Compliant=Yes, Series=WR-PHD, Stock 1=43988, Supplier 1=Digikey, Termination=Solder
R1: library part RC0603FR-0710KL, "GENERAL PURPOSE CHIP RESISTOR Metal Glaze/thick Film, 0.1W, 0ohm, Surface Mount, 0603", Case Code (Imperial)=0603, Case Code (Metric)=1608, Manufacturer=Yageo, Manufacturer Part Number=RC0603JR-070RL, Max Operating Temperature=155°C, Max Power Dissipation=100mW, Min Operating Temperature=-55°C, Package="0603 Yageo", Package Quantity=5000, Resistance=0mR, Resistance Tolerance=5%, Resistor Type="Thick Film", Supplier Part Number 1=3992146, Temperature Coefficient=200ppm/°C, Tolerance=1%, Voltage Rating=50V, Availability=Good, Case/Package=0603, Category="Chip SMD Resistors", Check_prices=https://www.snapeda.com/parts/RC0603FR-0710KL/Yageo/view-part/105933/?ref=eda, ComponentLink1Description=https://datasheet.ciiva.com/11808/pyu-r-int-6-11808700.pdf?src-supplier=Rs, ComponentLink1URL=https://datasheet.ciiva.com/11808/pyu-r-int-6-11808700.pdf?src-supplier=Rs, ComponentLink2Description=https://datasheet.ciiva.com/22747/443971-22747530.pdf?src-supplier=Element14, ComponentLink2URL=https://datasheet.ciiva.com/22747/443971-22747530.pdf?src-supplier=Element14, ComponentLink3Description=https://datasheet.ciiva.com/12555/rc0603-272842-12555254.pdf?src-supplier=Mouser, ComponentLink3URL=https://datasheet.ciiva.com/12555/rc0603-272842-12555254.pdf?src-supplier=Mouser, ComponentLink4Description=https://datasheet.ciiva.com/7746/1738695-7746421.pdf?src-supplier=Element14, ComponentLink4URL=https://datasheet.ciiva.com/7746/1738695-7746421.pdf?src-supplier=Element14, Construction=Rectangular, Contact Plating=Tin,Matte, Depth=0.8mm, Features="Moisture Resistant", Height=0.45mm, Lead Free=5697LeadFree, Length=1.6mm, MF=Yageo, Military Standard=Not, MP=RC0603FR-0710KL, Number of Pins=2, Number of Terminations=2, Packaging="Tape and Reel", Power Rating=100mW, Price=None, Pricing 1="5000=0.0013, 50000=0.0013, 150000=0.0012, 375000=0.0012, 1000000=0.0011 (USD)", Purchase-URL=https://pricing.snapeda.com/search/part/RC0603FR-0710KL/?ref=eda, Reach SVHC Compliant=Unknown, RoHS=Yes, RoHS Compliant=Yes, Series=RC, Size Code=0603, SnapEDA_Link=https://www.snapeda.com/parts/RC0603FR-0710KL/Yageo/view-part/105933/?ref=snap, Stock 1=10800000, Supplier 1="Future Electronics", Technology="THICK FILM", Termination=SMD/SMT, Voltage Rating (DC)=50V, Width=0.8mm
R2: library part RC0603FR-076M2L, "SMD Chip Resistor, 6.2 MOhm, ± 1%, 100 mW, 0603 [1608 Metric], Thick Film, General Purpose", Case Code (Imperial)=0603, Case Code (Metric)=1608, Manufacturer=Yageo, Max Operating Temperature=155°C, Max Power Dissipation=100mW, Min Operating Temperature=-55°C, Package=None, Resistance=6.2MR, Supplier Part Number 1=13-RC0603FR-076M2LCT-ND, Temperature Coefficient=100ppm/°C, Tolerance=1%, Voltage Rating=50V, Availability=Unavailable, Case/Package=0603, Category="Chip SMD Resistors", ComponentLink1Description=https://datasheet.ciiva.com/12576/rc0603-272842-12576220.pdf?src-supplier=Mouser, ComponentLink1URL=https://datasheet.ciiva.com/12576/rc0603-272842-12576220.pdf?src-supplier=Mouser, Features="Moisture Resistant", Height=0.022inch, Length=0.063inch, Manufacturer Part Number=RC0603FR-076M2L, MP=RC0603FR-076M2L, Number of Terminations=2, Packaging="Tape and Reel", Power Rating=100mW, Price=None, Pricing 1="1=0.1, 10=0.012, 50=0.0096, 100=0.0071, 500=0.00612, 1000=0.0051 (USD)", RoHS=Yes, RoHS Compliant=Yes, Series=RC, Stock 1=12242, Supplier 1=Digikey, Termination=SMD/SMT, Width=0.8mm
R3 R6: library part RC0603FR-0710KL, "Res Thick Film 2512 3M Ohm 1% 2W ±100ppm/°C Molded SMD Plastic T/R", Case Code (Imperial)=2512, Case Code (Metric)=6432, Manufacturer="Stackpole Electronics", Manufacturer Part Number=HVCB2512FDD3M00, Max Operating Temperature=150°C, Max Power Dissipation=2W, Min Operating Temperature=-55°C, Package="0603 Yageo", Resistance=3MR, Supplier Part Number 1=HVCB2512FDD3M00CT-ND, Temperature Coefficient=100ppm/°C, Tolerance=1%, Availability=Good, Case/Package=2512, Category="Chip SMD Resistors", Check_prices=https://www.snapeda.com/parts/RC0603FR-0710KL/Yageo/view-part/105933/?ref=eda, ComponentLink1Description=https://www.seielect.com/catalog/SEI-Packaging.pdf?src-supplier=Digikey, ComponentLink1URL=https://www.seielect.com/catalog/SEI-Packaging.pdf?src-supplier=Digikey, ComponentLink2Description=https://www.seielect.com/catalog/SEI-HVC.pdf?src-supplier=Digikey, ComponentLink2URL=https://www.seielect.com/catalog/SEI-HVC.pdf?src-supplier=Digikey, Features="Moisture Resistant", MF=Yageo, Mount="Surface Mount", MP=RC0603FR-0710KL, Number of Terminations=2, Packaging="Tape and Reel", Price=None, Pricing 1="1=4.36, 10=2.897, 50=2.5 (USD)", Purchase-URL=https://pricing.snapeda.com/search/part/RC0603FR-0710KL/?ref=eda, RoHS=Yes, RoHS Compliant=Yes, Series=HVC, SnapEDA_Link=https://www.snapeda.com/parts/RC0603FR-0710KL/Yageo/view-part/105933/?ref=snap, Stock 1=7905, Supplier 1=Digikey
R4: library part RC0603FR-076M2L, "Thick film chip resistor smd; 0603; 1MR; 5%; 0.1W; ; operating temperature: -55°C~125°C", Case Code (Imperial)=0603, Case Code (Metric)=1608, Manufacturer=Yageo, Manufacturer Part Number=RC0603JR-071ML, Max Operating Temperature=155°C, Max Power Dissipation=100mW, Min Operating Temperature=-55°C, Package=None, Package Quantity=5000, Resistance=1MR, Resistance Tolerance=5%, Resistor Type="Thick Film", Supplier Part Number 1=4024352, Temperature Coefficient=100ppm/°C, Voltage Rating=50V, Availability=Unavailable, Case/Package=0603, Category="Chip SMD Resistors", ComponentLink1Description=https://datasheet.ciiva.com/46395/443971-46395067.pdf?src-supplier=Element14, ComponentLink1URL=https://datasheet.ciiva.com/46395/443971-46395067.pdf?src-supplier=Element14, ComponentLink2Description=https://datasheet.ciiva.com/12555/rc0603-272842-12555342.pdf?src-supplier=Mouser, ComponentLink2URL=https://datasheet.ciiva.com/12555/rc0603-272842-12555342.pdf?src-supplier=Mouser, ComponentLink3Description=https://datasheet.ciiva.com/7746/443971-7746463.pdf?src-supplier=Element14, ComponentLink3URL=https://datasheet.ciiva.com/7746/443971-7746463.pdf?src-supplier=Element14, ComponentLink4Description=https://datasheet.ciiva.com/8883/pyu-rc0603-51-rohs-l-4-8883053.pdf?src-supplier=Avnet, ComponentLink4URL=https://datasheet.ciiva.com/8883/pyu-rc0603-51-rohs-l-4-8883053.pdf?src-supplier=Avnet, Construction=Rectangular, Contact Plating=Tin,Matte, Depth=0.8mm, Features="Moisture Resistant", Height=0.45mm, Lead Free=5697LeadFree, Length=1.6mm, MF=YAGEO, Military Standard=Not, MP=RC0603JR-071ML, Number of Pins=2, Number of Terminations=2, Packaging="Tape and Reel", Power Rating=100mW, Price=None, Pricing 1="5000=0.0018, 75000=0.0017, 200000=0.0017, 500000=0.0016, 1250000=0.0015 (USD)", Reach SVHC Compliant=No, RoHS=Yes, RoHS Compliant=Yes, Series=RC, Size Code=0603, Stock 1=1175000, Supplier 1="Future Electronics", Termination=SMD/SMT, Tolerance=5%, Voltage Rating (AC)=50V, Voltage Rating (DC)=50V, Width=0.8mm
R5: library part RC0603FR-079M1L, "Res Thick Film 0603 9.1M Ohm 1% 1/10W ±100ppm/°C Molded SMD Paper T/R", Case Code (Imperial)=0603, Case Code (Metric)=1608, Manufacturer=Yageo, Max Operating Temperature=155°C, Max Power Dissipation=100mW, Min Operating Temperature=-55°C, Package=None, Resistance=9.1MR, Supplier Part Number 1=13-RC0603FR-079M1LCT-ND, Temperature Coefficient=100ppm/°C, Tolerance=1%, Voltage Rating=50V, Availability=Unavailable, Case/Package=0603, Category="Chip SMD Resistors", ComponentLink1Description=https://datasheet.ciiva.com/12560/rc0603-272842-12560525.pdf?src-supplier=Mouser, ComponentLink1URL=https://datasheet.ciiva.com/12560/rc0603-272842-12560525.pdf?src-supplier=Mouser, Contact Plating=Tin,Matte, Features="Moisture Resistant", Height=0.022inch, Length=0.063inch, Manufacturer Part Number=RC0603FR-079M1L, MP=RC0603FR-079M1L, Number of Terminations=2, Packaging="Tape and Reel", Power Rating=100mW, Price=None, Pricing 1="1=0.1, 10=0.012, 50=0.0096, 100=0.0071, 500=0.00662, 1000=0.00612 (USD)", RoHS=Yes, RoHS Compliant=Yes, Series=RC, Stock 1=22431, Supplier 1=Digikey, Termination=SMD/SMT, Width=0.8mm
R7: "SMD Chip Resistor, 10 kOhm, ï¿½ 1%, 100 mW, 0603 [1608 Metric], Thick Film, General Purpose", Case Code (Imperial)=0603, Case Code (Metric)=1608, Manufacturer=Yageo, Max Operating Temperature=155°C, Max Power Dissipation=100mW, Min Operating Temperature=-55°C, Package="0603 Yageo", Resistance=10kR, Resistance Tolerance=1%, Resistor Type="Thick Film", Supplier Part Number 1=311-10.0KHRCT-ND, Temperature Coefficient=100ppm/°C, Voltage Rating=75V, Voltage Rating (DC)=50V, Availability=Good, Case/Package=0603, Category="Chip SMD Resistors", Check_prices=https://www.snapeda.com/parts/RC0603FR-0710KL/Yageo/view-part/105933/?ref=eda, ComponentLink1Description=https://datasheet.ciiva.com/7660/38590-7660789.pdf?src-supplier=Element14, ComponentLink1URL=https://datasheet.ciiva.com/7660/38590-7660789.pdf?src-supplier=Element14, ComponentLink2Description=https://datasheet.ciiva.com/7983/443971-7983596.pdf?src-supplier=Element14, ComponentLink2URL=https://datasheet.ciiva.com/7983/443971-7983596.pdf?src-supplier=Element14, ComponentLink3Description=https://datasheet.ciiva.com/22747/443971-22747519.pdf?src-supplier=Element14, ComponentLink3URL=https://datasheet.ciiva.com/22747/443971-22747519.pdf?src-supplier=Element14, ComponentLink4Description=https://datasheet.ciiva.com/46440/1868787-46440891.pdf?src-supplier=Element14, ComponentLink4URL=https://datasheet.ciiva.com/46440/1868787-46440891.pdf?src-supplier=Element14, ComponentLink5Description=https://datasheet.ciiva.com/7746/1738695-7746239.pdf?src-supplier=Element14, ComponentLink5URL=https://datasheet.ciiva.com/7746/1738695-7746239.pdf?src-supplier=Element14, ComponentLink6Description=https://datasheet.ciiva.com/15189/getdatasheetpartid-409289-15189591.pdf?src-supplier=Verical, ComponentLink6URL=https://datasheet.ciiva.com/15189/getdatasheetpartid-409289-15189591.pdf?src-supplier=Verical, Construction=Rectangular, Depth=0.8mm, Features="Moisture Resistant", Height=0.45mm, Lead Free=5697LeadFree, Lead Pitch=0.3mm, Length=1.6mm, Manufacturer Part Number=RC0603FR-0710KL, MF=Yageo, Military Standard=Not, MP=RC0603FR-0710KL, Number of Pins=2, Number of Terminations=2, Packaging="Tape and Reel", Power Rating=100mW, Price=None, Pricing 1="1=0.1, 10=0.012, 50=0.0096, 100=0.0071, 500=0.00662, 1000=0.00612 (USD)", Purchase-URL=https://pricing.snapeda.com/search/part/RC0603FR-0710KL/?ref=eda, Reach SVHC Compliant=No, RoHS=Yes, RoHS Compliant=Yes, Series=RC, Size Code=0603, SnapEDA_Link=https://www.snapeda.com/parts/RC0603FR-0710KL/Yageo/view-part/105933/?ref=snap, Stock 1=6826441, Supplier 1=Digikey, Termination=SMD/SMT, Tolerance=1%, Weight=7.1E-05oz, Width=0.8mm
SOLAR: "CONNECTOR HEADER, XH SERIES, 2 POSITION, 2.50MM, Press-Fit Solder, Detent Lock, Natural", Color=Natural, Contact Resistance=20mR, Current Rating=3A, Housing Color=White, Insulation Resistance=1GR, Manufacturer=JST, Manufacturer Part Number=B2B-XH-A(LF)(SN), Max Operating Temperature=85°C, Max Voltage Rating (AC)=250V, Min Operating Temperature=-25°C, Supplier Part Number 1=1638840, Category="Headers and Wire Housings", ComponentLink1Description=https://datasheet.ciiva.com/8052/5448-8052024.pdf?src-supplier=Element14, ComponentLink1URL=https://datasheet.ciiva.com/8052/5448-8052024.pdf?src-supplier=Element14, Contact Material=Brass, Contact Plating=Tin,Lead,Copper, Contact Type="Male Pin", Depth=5.75mm, Fastening Type=Detent, Housing Material=Polyamide, LatestRevisionDate=17-Jul-2002, LatestRevisionNote="Re-released for DXP Platform.", Lead Free=5697LeadFree, Lead Pitch=2.5mm, Length=7.4mm, Max Current Rating=3A, Max Voltage Rating (DC)=250V, Mount="Through Hole", Number of Contacts=2, Number of Positions=2, Number of Rows=1, Orientation=Straight, Packaging=Bulk, Pitch=2.5mm, Pricing 1="1=0.0563, 750=0.0541, 2500=0.0518, 7500=0.0498, 25000=0.0458 (USD)", Publisher="Altium Limited", Reach SVHC Compliant=No, RoHS=Yes, Series=XH, Stock 1=301686, Supplier 1="Future Electronics", Termination=Solder, Voltage Rating=250V, Voltage Rating (AC)=250V, Weight=28.349523g, Wire/Cable Gauge=22AWG
SW1: "Microminiature Top Actuated Tactile Switch Momentary SPST-NO 50mA 12VDC Surface Mount T/R", Contact Resistance=100mR, Manufacturer="ITT C&K", Manufacturer Part Number=PTS815SJM250SMTRLFS, Max Operating Temperature=70°C, Mfr_Name="C&K Components", Min Operating Temperature=-20°C, Operating Force=180gf, Ratings=IP40, Supplier Part Number 1=CKN12215-1-ND, Category="Tactile Switches", ComponentLink1Description=https://dznh3ojzb2azq.cloudfront.net/products/Tactile/PTS815/documents/datasheet.pdf?src-supplier=Digikey, ComponentLink1URL=https://dznh3ojzb2azq.cloudfront.net/products/Tactile/PTS815/documents/datasheet.pdf?src-supplier=Digikey, ComponentLink2Description=https://datasheet.octopart.com/PTS815SJM250SMTRLFS-C%26K-Components-datasheet-166147782.pdf?src-supplier=TME, ComponentLink2URL=https://datasheet.octopart.com/PTS815SJM250SMTRLFS-C%26K-Components-datasheet-166147782.pdf?src-supplier=TME, Illumination Type=Non-Illuminated, Mechanical Life=100000Cycles, Mount="Surface Mount", Number of Positions=2NUMBER, Packaging="Tape and Reel", Pricing 1="1=0.26, 10=0.209, 25=0.1928, 100=0.1701, 250=0.1564, 500=0.14674, 1000=0.13758 (USD)", RefDes=RefDes, RoHS=Yes, Series=PTS815, Stock 1=51812, Supplier 1=Digikey, Switch Function=Off-Mom, Switch Travel=0.2mm, Throw Configuration=SPST, Type=Type
U1: "WiFi-Module 802.11/BT 2, 4-2, 5GHz 150Mb/s", Manufacturer="Espressif Systems", Manufacturer Part Number=ESP32-WROOM-32D(M113DH3200PH3Q0), Max Frequency=2.484GHz, Max Operating Temperature=85°C, Max Supply Voltage=3.6V, Min Operating Temperature=-40°C, Min Supply Voltage=2.7V, Nominal Supply Current=500mA, Package="Module Espressif Systems", Supplier Part Number 1=1904-ESP32-WROOM-32D(M113DH3200PH3Q0)TR-ND, Availability="In Stock", Category="RF Receivers, Transceivers", Check_prices=https://www.snapeda.com/parts/ESP32-WROOM-32D/Espressif+Systems/view-part/?ref=eda, Data Rate=150Mbps, Height=3.25mm, Interface=39,40,1515,1518,1532Interface, MF="Espressif Systems", MP=ESP32-WROOM-32D, Number of ADC Channels=16NUMBER, Number of GPIO=26NUMBER, Price=None, Pricing 1="6500=3.8 (USD)", Pricing 2="1=4.2 (USD)", Purchase-URL=https://pricing.snapeda.com/search/part/ESP32-WROOM-32D/?ref=eda, RoHS=No, SnapEDA_Link=https://www.snapeda.com/parts/ESP32-WROOM-32D/Espressif+Systems/view-part/?ref=snap, Stock 2=445, Supplier 1=Digikey, Supplier 2=Digikey, Supplier Part Number 2=1965-ESP32-WROOM-32D-N8CT-ND
U2: "Ultra low power energy harvester and battery charger with embedded MPPT and LDOs", Manufacturer=STMicroelectronics, Supplier Part Number 1=511-SPV1050TTR, Category="Battery Management", ComponentLink1Description=http://www.mouser.com/ds/2/389/spv1050-974147.pdf?src-supplier=Mouser, ComponentLink1URL=http://www.mouser.com/ds/2/389/spv1050-974147.pdf?src-supplier=Mouser, ComponentLink2Description=http://www.farnell.com/datasheets/2291180.pdf?src-supplier=Farnell, ComponentLink2URL=http://www.farnell.com/datasheets/2291180.pdf?src-supplier=Farnell, ComponentLink3Description=http://www.st.com/web/en/resource/technical/document/datasheet/DM00100984.pdf?src-supplier=Avnet, ComponentLink3URL=http://www.st.com/web/en/resource/technical/document/datasheet/DM00100984.pdf?src-supplier=Avnet, ComponentLink4Description=http://www.st.com/content/ccc/resource/technical/document/datasheet/3e/91/0f/7c/32/3e/46/dd/DM00100984.pdf/files/DM00100984.pdf/jcr:content/translations/en.DM00100984.pdf?src-supplier=Digikey, ComponentLink4URL=http://www.st.com/content/ccc/resource/technical/document/datasheet/3e/91/0f/7c/32/3e/46/dd/DM00100984.pdf/files/DM00100984.pdf/jcr:content/translations/en.DM00100984.pdf?src-supplier=Digikey, ComponentLink5Description=https://datasheet.octopart.com/SPV1050TTR-STMicroelectronics-datasheet-82987336.pdf?src-supplier=SHENGYU+ELECTRONICS, ComponentLink5URL=https://datasheet.octopart.com/SPV1050TTR-STMicroelectronics-datasheet-82987336.pdf?src-supplier=SHENGYU+ELECTRONICS, Manufacturer Part Number=SPV1050TTR, Mfr_Name=STMicroelectronics, Pricing 1="1=3.06, 10=2.67, 50=2.67, 100=2.38, 1000=1.85, 10000=1.64 (USD)", RefDes=RefDes, RoHS=Yes, Stock 1=17837, Supplier 1=Mouser, Type=Type
U3: "General ISM < 1GHz LoRaâ„¢ Transceiver Module 410MHz ~ 525MHz Antenna Not Included, I-PEX Surface Mount", Package=None, Availability=https://www.amazon.com/JESSINIE-Wireless-Spectrum-Interface-Connector/dp/B0BLGQ6FYP, Check_prices=https://www.amazon.com/JESSINIE-Wireless-Spectrum-Interface-Connector/dp/B0BLGQ6FYP, MF=Ai-Thinker, MP=RA-02, Price=None, SnapEDA_Link=https://www.snapeda.com/parts/RA-02/AI-Thinker/view-part/?ref=snap

## Free pads (board coordinates)
  round 118.11 hole 78.74: 3(100,90) 3(100,3300) 3(1840,110) 3(1840,3280)

## Via types
v1: diameter 24, hole 12, Top Layer to Bottom Layer, tented both sides, 40 vias

## Nets (pads, with @x,y where several pads share a name; then routed paths per layer and width w, separated by ;. In a path a pad name is that pad's centre, name@x,y a point inside that pad or via, vN(x,y) a via of type N, cw(c..) or ccw(c..) an arc to the next point about the centre after c; other vN are vias at no path point)
+3V3_DRV: C1.1 C2.2 C7.1 C8.2 FDTI1.2 J1.1 J1.17 P1.1 P3.1 P6.4 P7.4 P12.1 R7.2 U1.2 U3.3 | length 8439.1
  Top Layer w10: 350,2990 v1(375,2965)
  Top Layer w30: P12.1 225.44,3015 250.44,2990 350,2990 ; J1.1 1780,280 1895,395 1895,540.36 1840.36,595 C8.2 C7.1 ; FDTI1.2 1835,2690 ; P3.1 1835,2795 1835,2690 ; R7.2 1878.54,2580 1873.46,2585.08 1873.46,2672.43 1855.89,2690 1835,2690
  Bottom Layer w10: J1.1 J1.1@195,275
  Bottom Layer w30: P12.1 190,2910 190,2690 P1.1@90,2590 ; J1.17 310,1080 340,1110 ; J1.1@195,275 305,275 340,310 340,1110 ; v1(375,2965) v1@415.4,2924.6 ; v1(415.4,2928.56) v1@415.4,2924.6 ; P7.4 435,1660 340,1755 ; FDTI1.2 1650,2595 1650,2265 1590,2205 790,2205 ; 340,1110 340,1755 ; 340,1755 P6.4 790,2205 ; v1@415.4,2924.6 790,2550 790,2205
+5V: J1.2 J1.4 P4.1 P7.1 | length 3000.5
  Top Layer w30: P4.1 375,2575 375,1910 580,1705 580,1450 P7.1
  Bottom Layer w30: J1.4 J1.2 90,235 130,195 370,195 425,250 425,1295 P7.1
AO: P4.3 U1.6 | length 255.8
  Top Layer w10: P4.3 437.52,2837.52 U1.6
DAT: P1.3 U1.16 | length 775.7
  Top Layer w10: v1(715,2315) 755,2315 771.61,2331.61 U1.16
  Bottom Layer w10: P1.3 190,2365 240,2315 v1(715,2315)
DIO0: J1.33 U3.5 | length 2022.9
  Top Layer w10: J1.33 415,1655 415,1255 v1(490,1180) ; v1@1429.29,753.74 U3.5
  Bottom Layer w10: v1(490,1180) 725,1180 1153.05,751.95 v1(1429.29,751.95)
GND: BAT1.2 BOOT.2 C1.2 C2.1 C3.2 C4.2 C5.2 C6.2 C7.2 C8.1 FDTI1.6 J1.6 J1.9 J1.14 J1.20 J1.25 J1.30 J1.34 J1.39 P1.2 P3.2 P4.2 P6.2 P7.2 P7.3 P12.2 R5.1 R6.1 SOLAR.2 SW1.1 SW1.2 U1.1 U1.15 U1.38 U1.39_1 U1.39_2 U1.39_3 U1.39_4 U1.39_5 U1.39_6 U1.39_7 U1.39_8 U1.39_9 U1.39_10 U1.39_11 U1.39_12 U1.39_13 U1.39_14 U1.39_15 U1.39_16 U1.39_17 U1.39_18 U1.39_19 U1.39_20 U1.39_21 U2.4 U2.5 U2.17 U2.18 U2.19 U2.20 U2.21 U3.1 U3.2 U3.9 U3.16 | length 1962.8
  Top Layer w7: U2.5 U2.4 U2.21@1215.2,1575
  Top Layer w10: U2.21@1215.2,1575 U2.21
  Top Layer w30: v1(255,3100) 367.5,3100 C2.1@367.5,3102.5 ; C2.1@365,3105 C2.1 C1.2 505,3100 517.48,3087.52 U1.1 ; U1.15 724.33,2400.87 724.33,2464.33 v1(725,2465) ; U1.39_12 U1.39_4 U1.39_17 U1.39_7 U1.39_20 U1.39_8 U1.39_18 U1.39_5 U1.39_13 U1.39_2 ; U1.39_1 U1.39_10 U1.39_2 ; U1.39_21 U1.39_9 U1.39_19 U1.39_6 U1.39_14 U1.39_3 U1.39_11 U1.39_2 ; U2.21 U2.18 ; U1.38 1282.5,3088.76 1553.76,3088.76 FDTI1.6 ; C3.2 1372.5,1712.5 1407.5,1712.5 v1(1410,1715) ; v1(1842.32,2097.68) SW1.2 SW1.1 1842.32,2392.08 1880,2429.76 C6.2
  other v1: 843.06,431.62 1610,435 1660,435 1585,515 1770,530 1800,530 958.06,1001.62 1178.06,1471.62 1393.06,1496.62 979.11,1522.05 1148.06,1556.62 1058.06,1606.62 1215,1690 1141.05,1831.75 1272.49,1866.9 300,3100 260,3145 300,3145
MISO: J1.21 U3.13 | length 1035.9
  Top Layer w10: J1.21 290,1180 290,1060 v1(500,850) ; v1(815,675) U3.13
  Bottom Layer w10: v1(500,850) 640,850 v1(815,675)
MOSI: J1.19 U3.14 | length 1003.7
  Top Layer w10: J1.19 245,1125 245,1115 260,1100 260,1030 v1(505,785) ; v1(820,600) 901.26,600 U3.14
  Bottom Layer w10: v1(505,785) 635,785 v1(820,600)
NetBOOT_1: BOOT.1 U1.25 | length 266.9
  Top Layer w10: U1.25 1288.78,2430 BOOT.1
NetC3_1: C3.1 R2.2 U2.15 | length 496.7
  Top Layer w8: U2.15 1290,1629.14 1310.86,1650
  Top Layer w10: 1310.86,1650 1325,1650 ; v1(1324.62,1686.73) 1324.62,1650.38 1325,1650 ; v1(1365,1420) 1365,1363.94 R2.2 ; C3.1 1325,1650
  Bottom Layer w10: v1(1324.62,1686.73) 1324.62,1682.94 1310,1668.32 1310,1475 v1(1365,1420)
NetC4_1: C4.1 P6.1 U2.12 | length 2237.1
  Top Layer w10: U2.12 1315,1575 1330,1560 C4.1 ; 1550,1295 1550.86,1294.14 1550.86,1285.86
  Top Layer w20: P6.1 985,2010 795,1820 795,1315 920,1190 1455,1190 1550.86,1285.86 ; C4.1 1525,1560 1550,1535 1550,1295
NetC5_1: C5.1 U2.3 | length 155
  Top Layer w7: 1124.25,1590.75 U2.3
  Top Layer w10: C5.1 1068.5,1535 1124.25,1590.75
NetJ1_8: J1.8 U1.28 | length 3769.4
  Top Layer w10: J1.8 144.88,525.12 505.12,525.12 675,695 675,1780 729.53,1834.53 729.53,2159.53 755,2185 1605,2185 1650,2230 1650,2465 1590,2525 1430,2525 1367.48,2587.52 U1.28
NetJ1_10: J1.10 U1.27 | length 3634.8
  Top Layer w10: J1.10 140,630 480,630 635,785 635,2195 685,2245 1600,2245 1620,2265 1620,2455 1570,2505 1385,2505 1352.48,2537.52 U1.27 U1.27@1293.98,2524.8
NetL1_1: L1.1 R1.2 SOLAR.1 | length 1089.8
  Top Layer w20: R1.2 1048.94,1863.94 1120,1935 1635,1935 1660,1910 1660,1790
  Top Layer w30: L1.1@1650,1765 L1.1 SOLAR.1
NetL1_2: L1.2 U2.16 | length 234.5
  Top Layer w30: 1320,1800 1505,1800 L1.2
NetP6_5: P6.5 U1.14 | length 357
  Top Layer w10: P6.5 585,2424.8 597.72,2437.52 U1.14
NetR1_1: R1.1 R3.2 U2.1 | length 286.2
  Top Layer w8: U2.1@1170.83,1623.31 1170.83,1674.17
  Top Layer w10: R1.1 991.46,1775 1006.54,1759.92 1006.54,1743.46 1033.46,1716.54 1033.46,1710.08 1048.54,1695 R3.2 1053.94,1690 1155,1690 1170.83,1674.17 ; R3.2@1048.54,1705 R3.2@1048.94,1705
NetR2_1: R2.1 R4.2 U2.10 | length 315